# Altium PCB TYH-PD67W 2C1A 主控板.pcbdoc
Units mm, origin at the board's own origin, x right, y up, seen from the top; angles counter-clockwise.
Board outline 94.32 x 66.89 mm, 5 copper layers (Top Layer, Signal Layer 3, Signal Layer 1, Signal Layer 2, Bottom Layer), stack 0.941 mm thick; 54 components, 153 nets, 193 pads, 200 vias.
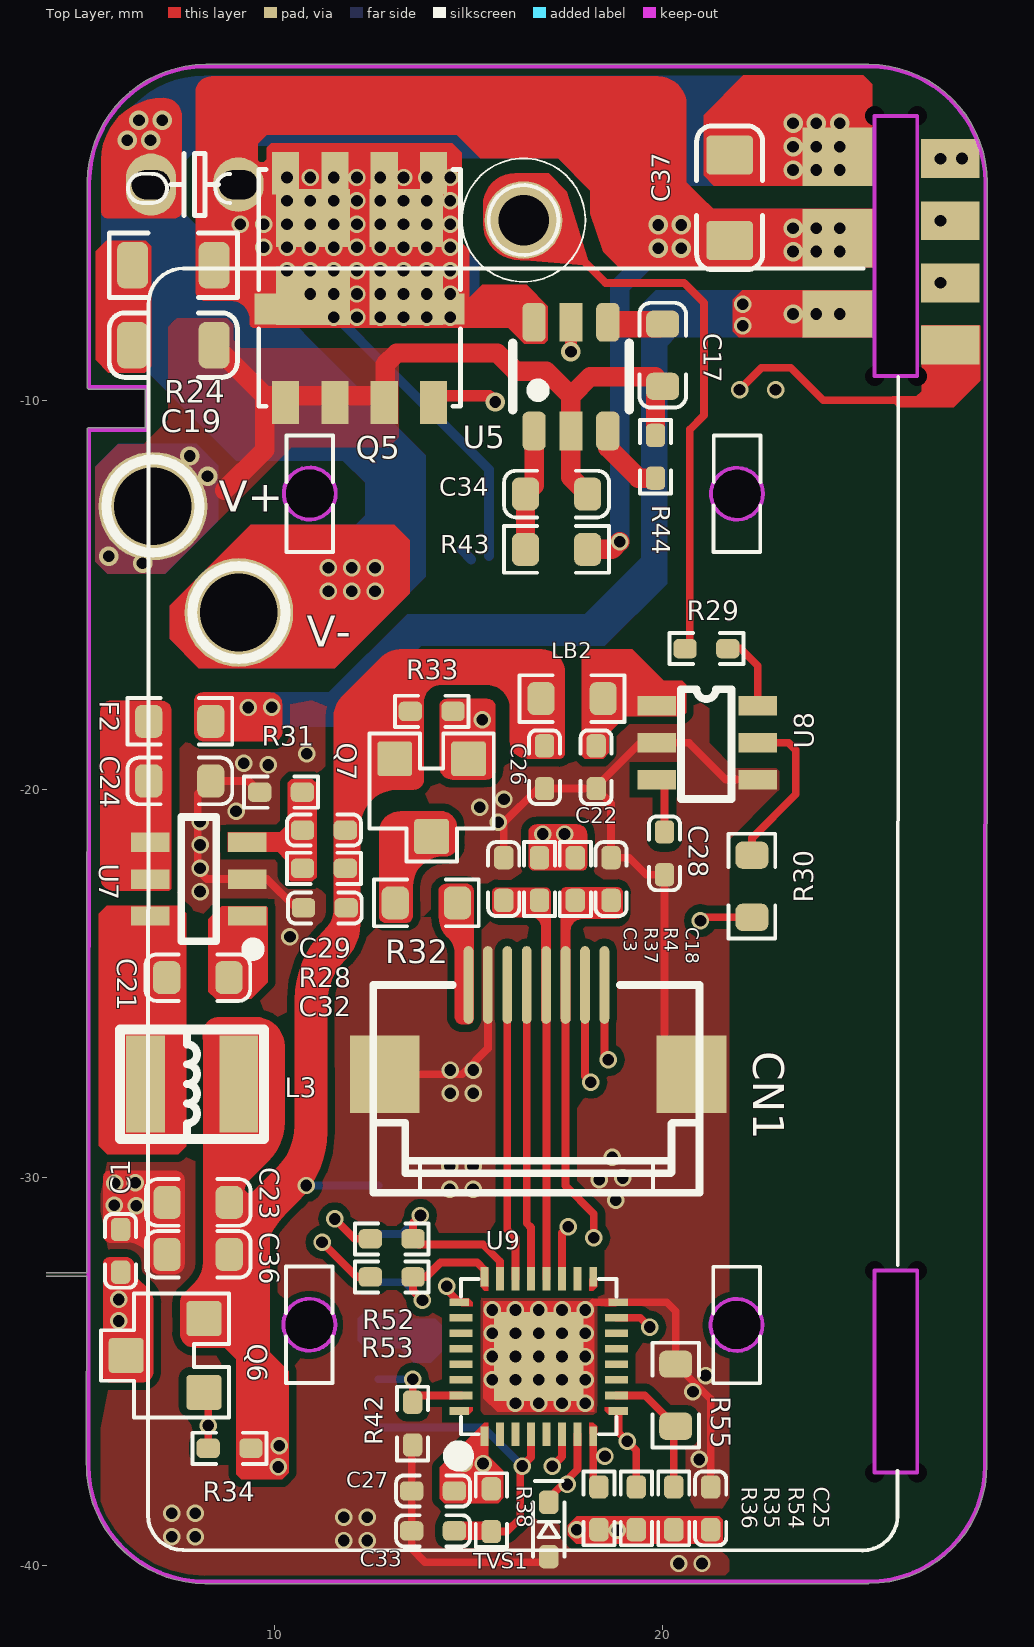
[diagram p0: Top Layer view]
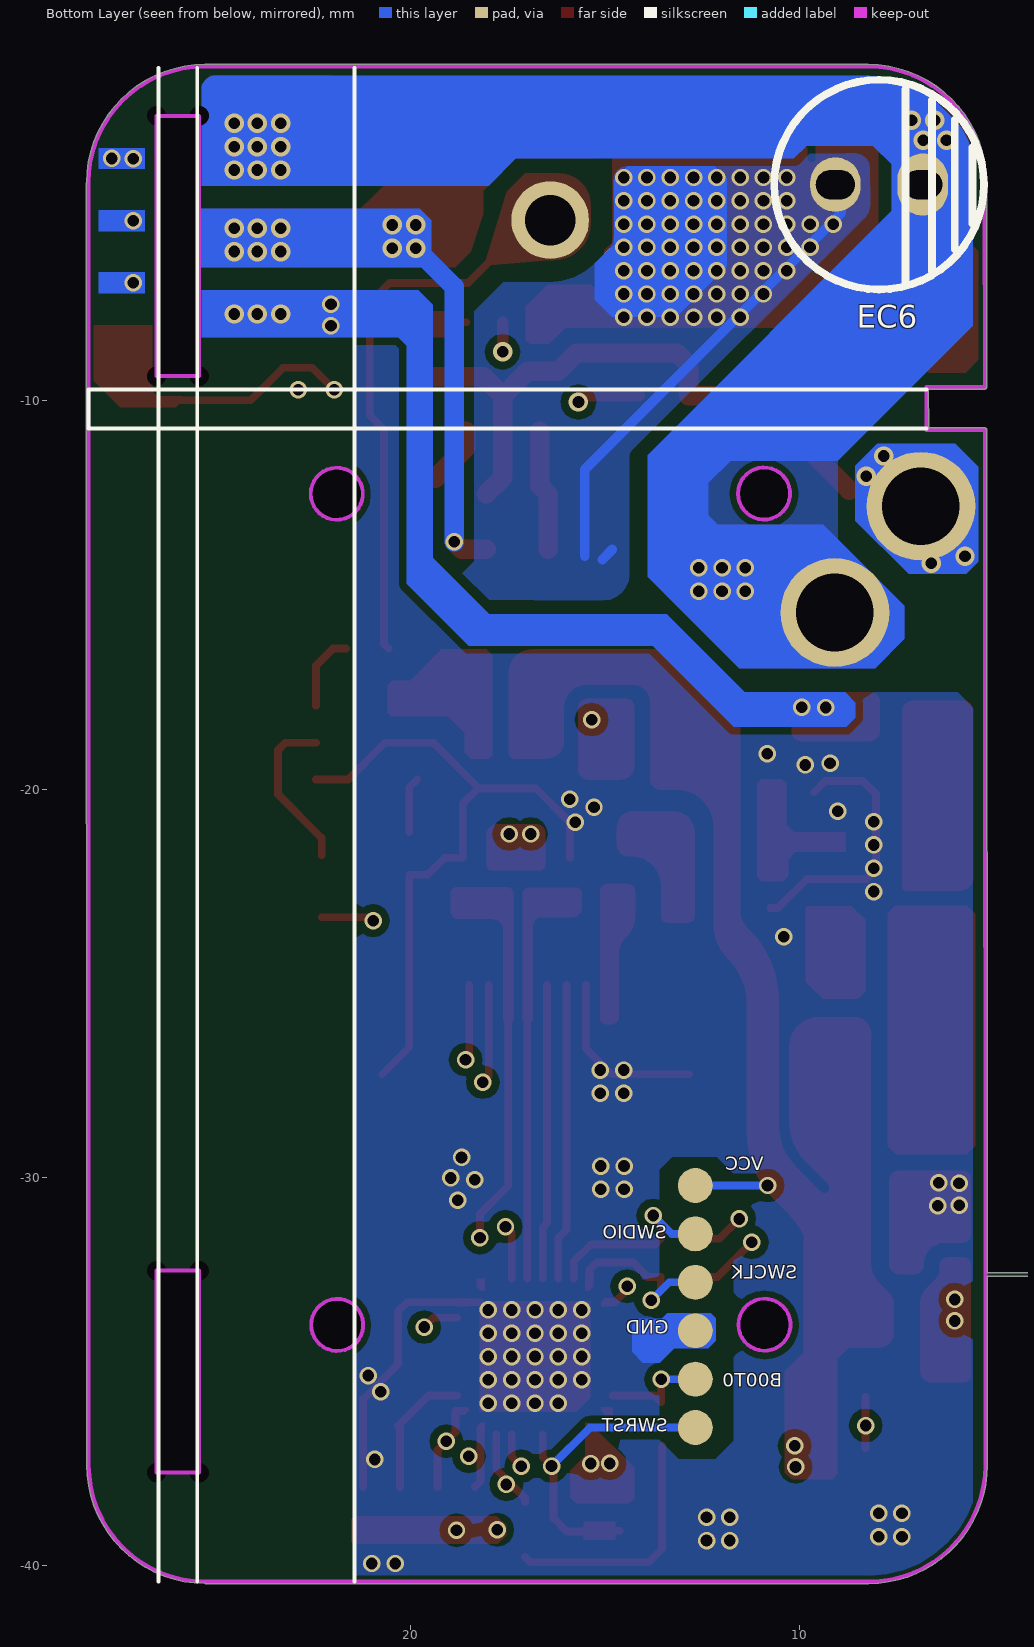
[diagram p1: Bottom Layer view, seen from below]
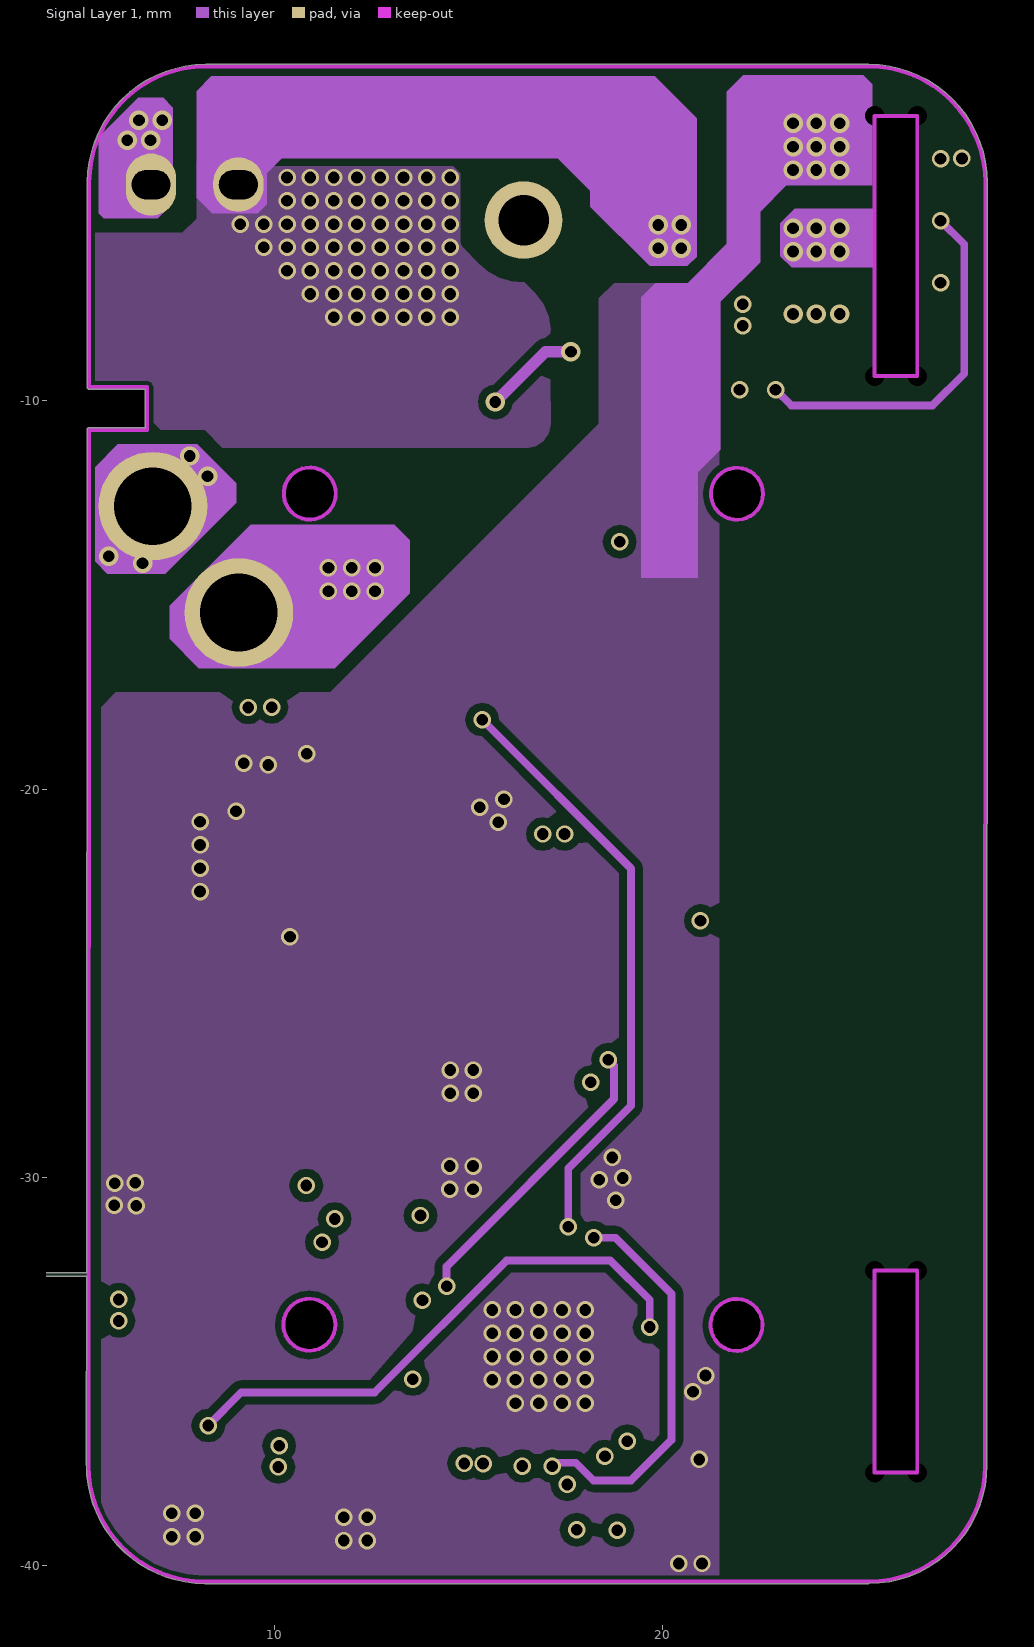
[diagram p2: Signal Layer 1]
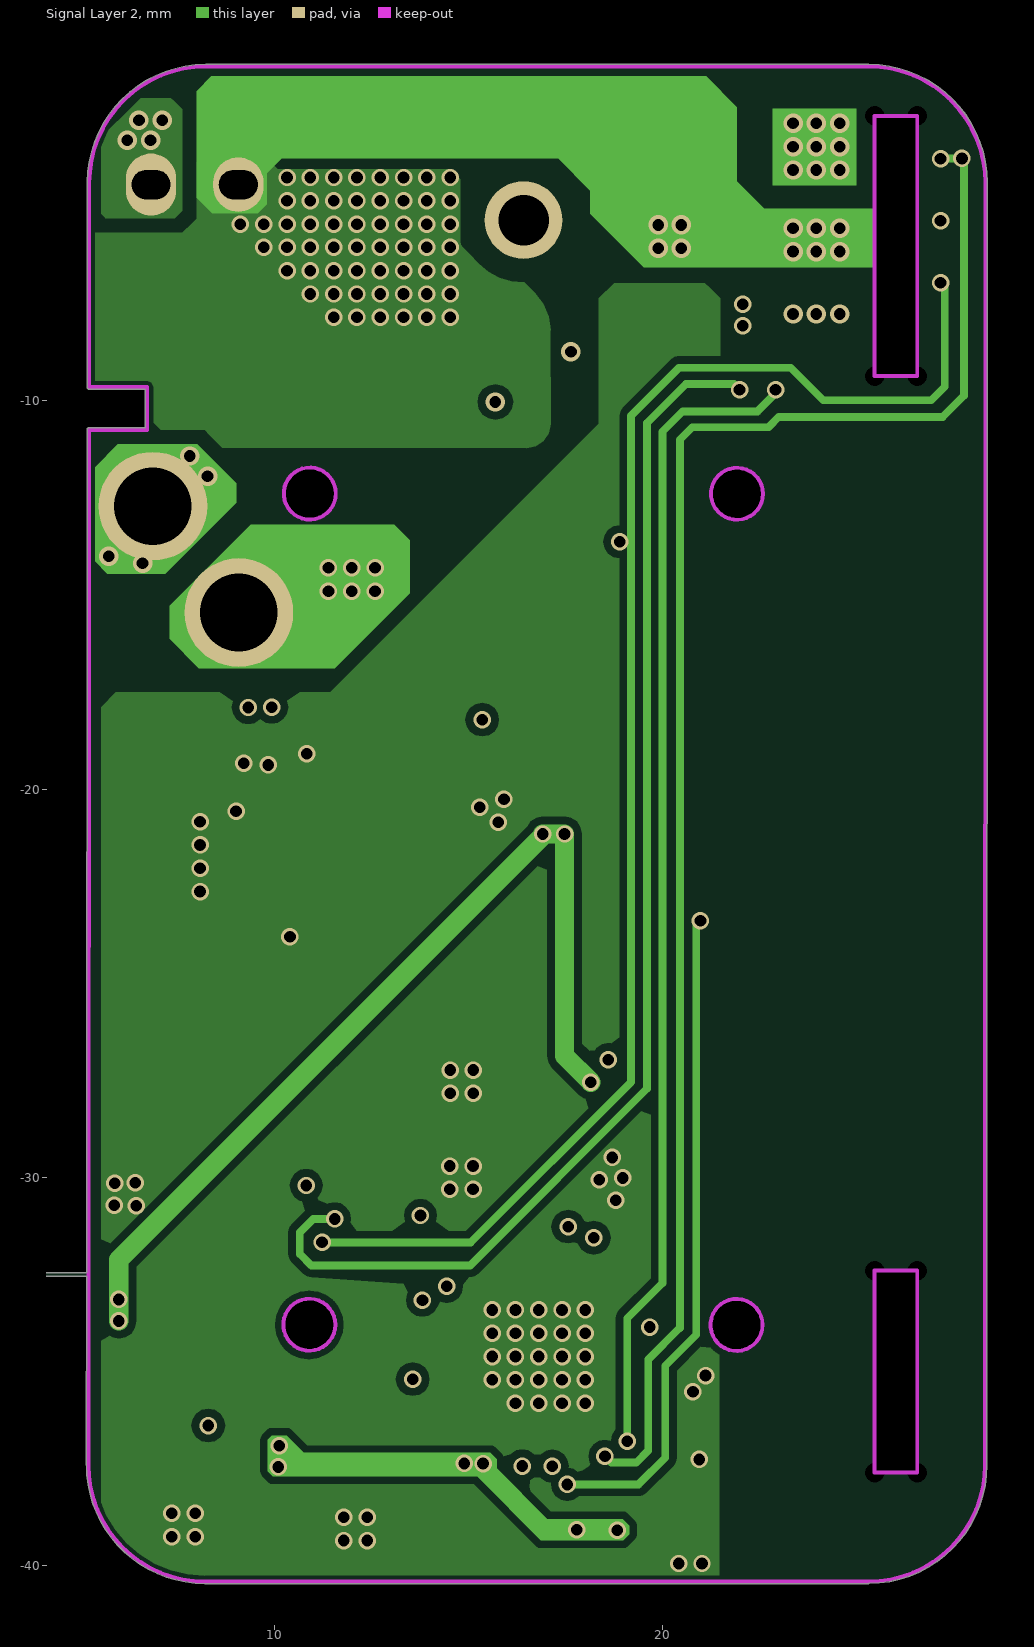
[diagram p3: Signal Layer 2]
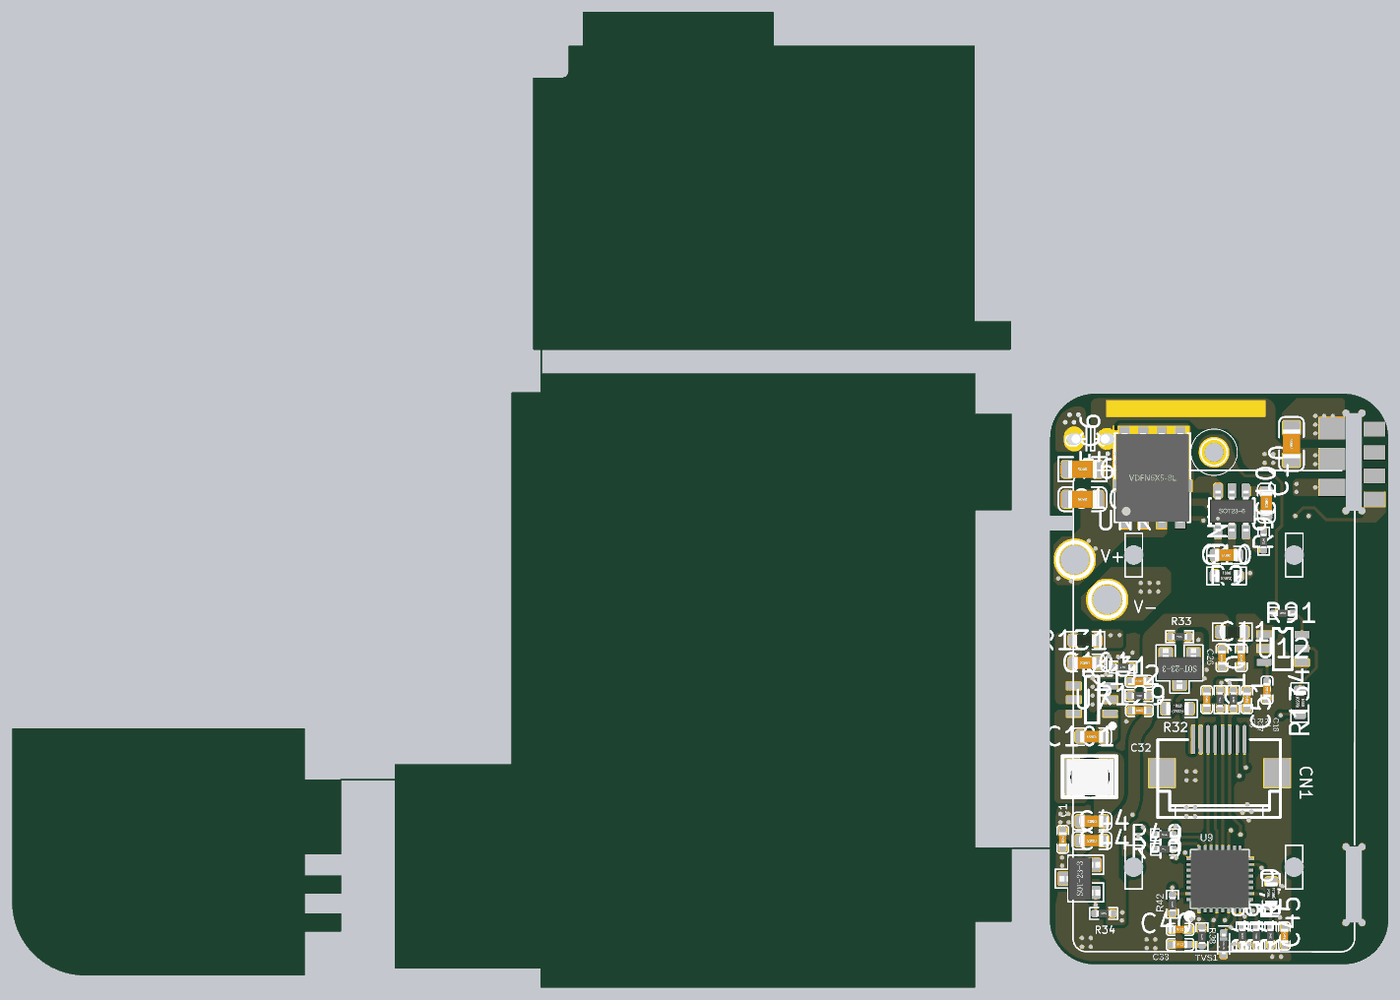
[diagram p4: 3D render of the assembled board from above, using the file's embedded part models]

## Layer stack, top to bottom
Top Solder: solder mask 0.0102, Solder Resist, Dk 3.5
Top Layer: signal copper 0.0356
Dielectric 1: core 0.254, FR-4, Dk 4.2
Signal Layer 3: signal copper 0.036
Dielectric 4: prepreg 0.127, Dk 4.2
Signal Layer 1: signal copper 0.036
Dielectric 2: core 0.254, Dk 4.2
Signal Layer 2: signal copper 0.036
Dielectric 3: prepreg 0.127, Dk 4.2
Bottom Layer: signal copper 0.0356
Bottom Solder: solder mask 0.0102, Solder Resist, Dk 3.5

## Board outline
-60.945,-41.225 -45.944,-41.225 ccw(c-45.944,-41.2) -45.919,-41.2 -45.919,-38.225 -43.445,-38.225 ccw(c-43.445,-38.2) -43.419,-38.2 -43.419,-37 ccw(c-43.445,-37) -43.445,-36.975 -45.919,-36.975 -45.919,-35.625 -43.445,-35.625 ccw(c-43.445,-35.6) -43.419,-35.6 -43.419,-34.4 ccw(c-43.445,-34.4) -43.445,-34.375 -45.919,-34.375 -45.919,-32.925 -43.445,-32.925 ccw(c-43.445,-32.9) -43.419,-32.9 -43.419,-27.85 -39.751,-27.85 -39.759,-40.693 ccw(c-39.709,-40.7) -39.709,-40.75 -29.759,-40.752 -29.76,-42.002 ccw(c-29.71,-42.002) -29.71,-42.052 0,-42.052 ccw(c0,-42.002) 0.05,-42.002 0.05,-37.55 2.5,-37.55 ccw(c2.5,-37.5) 2.55,-37.5 2.55,-32.55 5.163,-32.55 5.16,-37.409 ccw(c5.21,-37.409) 5.16,-37.409 ccw(c8.207,-37.409) 8.207,-40.456 ccw(c8.207,-40.406) 8.207,-40.456 ccw(c8.207,-40.406) 8.207,-40.456 25.296,-40.456 ccw(c25.296,-40.406) 25.308,-40.455 ccw(c25.296,-37.407) 28.344,-37.407 28.352,-4.393 ccw(c28.302,-4.393) 28.352,-4.393 ccw(c28.302,-4.393) 28.351,-4.381 ccw(c25.304,-4.393) 25.304,-1.346 8.229,-1.346 ccw(c8.229,-4.393) 5.181,-4.375 ccw(c5.228,-4.393) 5.178,-4.393 5.175,-9.653 ccw(c5.225,-9.653) 5.225,-9.703 6.674,-9.704 6.673,-10.703 5.225,-10.702 ccw(c5.225,-10.753) 5.174,-10.753 5.163,-32.45 0.05,-32.45 0.05,-9.32 2.5,-9.32 ccw(c2.5,-9.269) 2.55,-9.269 2.55,-2.769 ccw(c2.5,-2.769) 2.5,-2.719 0.05,-2.719 0.05,0 ccw(c0,0) 0,0.05 -29.65,0.05 -29.65,1.682 2.433,1.682 ccw(c2.433,1.733) 2.483,1.733 ccw(c2.433,1.733) 2.482,1.745 ccw(c2.45,1.784) 2.5,1.784 2.5,3.584 ccw(c2.45,3.584) 2.45,3.635 0,3.635 0,22.484 ccw(c-0.05,22.484) -0.014,22.52 ccw(c-0.05,22.484) -0.05,22.535 -13.768,22.535 -13.768,24.784 ccw(c-13.819,24.784) -13.819,24.835 -26.819,24.835 ccw(c-26.819,24.784) -26.869,24.784 -26.869,22.535 -27.789,22.535 ccw(c-27.789,22.484) -27.84,22.483 -27.84,20.784 cw(c-28.289,20.784) -28.289,20.335 cw(c-28.289,20.784) -28.289,20.335 cw(c-28.289,20.284) -28.289,20.335 -30.217,20.335 ccw(c-30.217,20.284) -30.268,20.284 -30.268,1.733 ccw(c-30.217,1.733) -30.217,1.682 -29.75,1.682 -29.75,-1.25 -31.7,-1.25 ccw(c-31.7,-1.3) -31.75,-1.3 -31.75,-26.75 -39.7,-26.75 ccw(c-39.7,-26.8) -39.75,-26.8 -39.751,-27.75 -43.445,-27.75 ccw(c-43.445,-27.8) -43.488,-27.775 -45.919,-27.775 -45.919,-24.3 ccw(c-45.945,-24.3) -45.945,-24.275 -65.945,-24.275 ccw(c-65.945,-24.3) -65.97,-24.3 -65.97,-36.2 ccw(c-60.945,-36.2)
cut-out: 26.55,-32.4 25.45,-32.4 25.45,-37.6 26.55,-37.6
cut-out: 25.45,-9.369 26.55,-9.369 26.55,-2.669 25.45,-2.669
cut-out: 11.579,-12.393 11.579,-12.392 ccw(c10.912,-12.392) 10.912,-11.725 10.902,-11.725 ccw(c10.902,-12.39) 10.237,-12.39 10.237,-12.418 ccw(c10.889,-12.418) 10.889,-13.07 10.902,-13.07 ccw(c10.902,-12.393)
cut-out: 11.567,-33.793 11.567,-33.792 ccw(c10.9,-33.792) 10.9,-33.125 10.89,-33.125 ccw(c10.89,-33.79) 10.226,-33.79 10.226,-33.818 ccw(c10.877,-33.818) 10.877,-34.47 10.89,-34.47 ccw(c10.89,-33.793)
cut-out: 22.567,-33.799 22.567,-33.798 ccw(c21.9,-33.798) 21.9,-33.131 21.89,-33.131 ccw(c21.89,-33.796) 21.226,-33.796 21.226,-33.824 ccw(c21.877,-33.824) 21.877,-34.476 21.89,-34.476 ccw(c21.89,-33.799)
cut-out: 22.579,-12.399 22.579,-12.398 ccw(c21.912,-12.398) 21.912,-11.731 21.902,-11.731 ccw(c21.902,-12.396) 21.237,-12.396 21.237,-12.424 ccw(c21.889,-12.424) 21.889,-13.076 21.902,-13.076 ccw(c21.902,-12.399)

## Design rules (kind name [scope] priority, off if disabled: settings)
Clearance Clearance_19 [InNet('NetC4_2') vs InNet('PGND')] p1: gap=0.4
Clearance Clearance_18 [InNet('NetR15_1') vs InNet('PGND')] p2: gap=1
Clearance Clearance_17 [InNet('NetN_1') vs InNet('NetBD1_1')] p3: gap=1.55
Clearance Clearance_16 [InNet('NetN_1') vs InNet('PGND')] p4: gap=1.5
Clearance Clearance_15 [InNet('VIN') vs InNet('PGND')] p5 off: gap=5.8
Clearance Clearance_14 [InNet('CS') vs InNet('Bais-L')] p6: gap=0.45
Clearance Clearance_13 [InNet('SW') vs InNet('CS')] p7: gap=1.5
Clearance Clearance_12 [InNet('NetR15_1') vs InNet('CS')] p8: gap=1
Clearance Clearance_11 [InNet('NetBD1_3') vs InNet('CS')] p9: gap=1.1
Clearance Clearance_10 [InNet('HV') vs InNet('CS')] p10: gap=1.1
Clearance Clearance_9 [InNet('NetL2_1') vs InNet('CS')] p11: gap=1.5
Clearance Clearance_8 [InNet('NetC1_2') vs InNet('PGND')] p12: gap=1.2
Clearance Clearance_7 [InNet('NetBD1_3') vs InNet('PGND')] p13: gap=1.2
Clearance Clearance_6 [InNet('NetC2_2') vs InNet('PGND')] p14: gap=1.3
Clearance Clearance_5 [InNet('Bais-L') vs InNet('PGND')] p15: gap=0.45
Clearance Clearance_4 [InNet('SW') vs InNet('PGND')] p16: gap=1.5
Clearance Clearance_3 [InNet('HV') vs InNet('PGND')] p17: gap=1.2
Clearance Clearance_2 [InNet('NetL2_1') vs InNet('PGND')] p18: gap=1.5
Clearance Clearance_1 [OnLayer('Keep-Out Layer')] p19: gap=0.1
Clearance [All] p20: gap=0.2
PlaneConnect [All] p1: planeconnectstyle=Direct reliefexpansion=0.508 reliefentries=4 reliefconductorwidth=0.3 reliefairgap=0.254
PolygonConnect [All] p1: connectstyle=Direct reliefconductorwidth=0.3 reliefentries=4 polygonreliefangle="90 Angle" airgapwidth=0.3
RoutingVias [All] p1: holewidth=0.711 width=1.27 viastyle="Through Hole" minholewidth=0.711 minwidth=1.27 maxholewidth=0.711 maxwidth=1.27
SolderMaskExpansion [All] p1: expansion=0.05
Width [All] p1: maxlimit=10 minlimit=0.1 preferedwidth=0.2
28 further rules are at their usual default settings.

## Components (designator, comment, footprint, x,y, rotation, side; value= is the part's Value field where it differs from the comment)
C1 "100nF 0402" 0402C 6.439,-30.942 r270 top
C3 "NC/0402" 0402C 16.302,-21.368 r270 top
C17 "2.2nF/250V/0805" 0603CX#1 19.995,-8.031 r270 top (schematic designator C10)
C18 "NC/0402" 0402C 19.066,-21.368 r270 top (schematic designator C2)
C19 "2.2nF/250V/0805" 0805CX 8.445,-8.572 r180 top (schematic designator C10)
C21 "104/50V X7R 0603" 0603CX#1 7.226,-24.856 r0 top (schematic designator C101)
C22 "106/10V" 0402C 17.882,-20.389 r90 top (schematic designator C101)
C23 "10uF/10V" 0603CX#1 8.836,-30.645 r180 top (schematic designator C44)
C24 "104/50V X7R 0603" 0603CX#1 8.361,-19.794 r180 top (schematic designator C101)
C25 "1uF/25V" 0402C 21.631,-37.57 r270 top (schematic designator C45)
C26 "10nF" 0402C 16.553,-20.389 r90 top (schematic designator C4)
C27 "0.1uF/25V" 0402C 13.132,-37.674 r0 top (schematic designator C40)
C28 "104/25V/NC" 0402C 19.642,-22.606 r90 top (schematic designator C51)
C29 "NC" 0402C 10.323,-20.658 r0 top (schematic designator C112)
C32 "1uF" 0402C 10.347,-22.661 r0 top (schematic designator C5)
C33 "100nF" 0402C 13.132,-38.7 r0 top (schematic designator C6)
C34 "2.2nF/250V/0805" 0603CX#2 17.262,-12.406 r180 top (schematic designator C10)
C36 "10uF/10V" 0603CX#1 8.836,-31.982 r180 top (schematic designator C44)
C37 "2.2nF/250V/0805" 0805C 20.869,-6.628 r90 top (schematic designator C10)
CN1 "8.07A0.006200" "70W 屏座" 16.693,-25.17 r270 top locked
EC6 "560uF/25V/6.3*16" EG-5*17L 7.946,-4.438 r90 bottom
F2 "10KF 0402" 0603LX 6.761,-18.259 r0 top (schematic designator R131)
L3 "3.3uH NR3010" NR3010 7.885,-27.593 r0 top (schematic designator L4)
LB2 "104/25V" 0603LX 18.462,-17.671 r180 top (schematic designator C11)
Q5 "Comment" DFN5*6 10.286,-10.048 r0 top
Q6 "2N7002KL SOT-23" SOT-23_R 7.183,-34.585 r90 top (schematic designator Q8)
Q7 "2N7002KL SOT-23" SOT-23_R 14.047,-20.221 r180 top (schematic designator Q8)
R4 "4.7K" 0402R 17.745,-21.768 r270 top
R24 "10R/1206" 0805RX 8.445,-6.513 r180 top (schematic designator R6)
R28 "31.6KF 0402" 0402R 10.723,-22.042 r0 top (schematic designator R129)
R29 "10K" 0402R 21.672,-16.386 r180 top (schematic designator R91)
R30 "100R" 0603RX#1 22.293,-22.503 r270 top (schematic designator R134)
R31 "10KF 0402" 0402R 9.618,-20.082 r0 top (schematic designator R131)
R32 "10R" 0603RX#2 13.11,-22.934 r0 top (schematic designator R2)
R33 "10K" 0402R 13.498,-18 r0 top (schematic designator R1)
R34 "10K" 0402R 9.393,-36.975 r180 top (schematic designator R3)
R35 "4K7 NC" 0402R 19.316,-37.97 r270 top (schematic designator R49)
R36 "4K7 NC" 0402R 18.353,-37.97 r270 top (schematic designator R49)
R37 "4.7K" 0402R 16.823,-21.768 r270 top (schematic designator R5)
R38 "10K" 0402R 15.583,-39.117 r90 top (schematic designator R6)
R42 "10K" 0402R 13.558,-36.889 r90 top (schematic designator R7)
R43 "51R/0402" 0603RX#1 17.263,-13.831 r0 top (schematic designator R9)
R44 "51R/0402" 0402R 19.81,-10.896 r270 top (schematic designator R9)
R52 "4K7 NC" 0402R 12.468,-31.582 r0 top (schematic designator R49)
R53 "4K7 NC" 0402R 12.468,-32.563 r0 top (schematic designator R49)
R54 "4K7 NC" 0402R 20.28,-37.97 r270 top (schematic designator R49)
R55 "4K7 NC" 0603rx 20.33,-35.608 r90 top (schematic designator R49)
TVS1 "Comment" SOD-723 17.062,-39.065 r90 top
U5 "Comment" SOT-23-6S 16.683,-10.783 r90 top
U7 "RY9420BT6" SOT-23-6#1 8.051,-22.32 r180 top
U8 "RM1233A" SOT-23-6#2 21.143,-18.808 r0 top (schematic designator U12)
U9 "Comment" "QFN4*4-32L TYH" 16.805,-34.612 r0 top
V+ "Comment" PAD-AC 6.869,-12.718 r0 top
V- "Comment" PAD-AC 9.083,-15.458 r0 top

## Footprints (in the part's own frame and the unit in brackets; to place one, negate y for a bottom-side part, rotate by r counter-clockwise, add the part's x,y. Pads: shape width x height; smd on the part's side, far side on the other; paste and mask are expansions set on the pad)
"70W 屏座" [mm]
  oval 2x0.25 smd: 1(-0.124,-1.698) 2(-0.124,-1.198) 3(-0.124,-0.698) 4(-0.124,-0.198) 5(-0.124,0.302) 6(-0.124,0.802) 7(-0.124,1.302) 8(-0.124,1.802)
  rect 2x1.8 smd: 2(2.176,-3.855) 2(2.176,4.045)
  silkscreen extent -0.12,-4.15 5.23,4.25
0402C [mm]
  rrect50% 0.6x0.5 smd: 1(0.4,-0.4) 2(1.5,-0.4)
  silkscreen extent 0,-0.8 1.9,0, body extent 0.45,-0.66 1.45,-0.14, height 0.53
0402R [mm]
  rrect50% 0.6x0.5 smd: 1(0,0) 2(1.1,0)
  silkscreen extent -0.4,-0.4 1.5,0.4, body extent 0.05,-0.25 1.05,0.25, height 0.3
0603CX#1 [mm]
  rrect50% 0.7x0.85 smd: 1(0,0) 2(1.6,0)
  silkscreen extent -0.55,-0.6 2.15,0.6, body extent 0,-0.41 1.6,0.41, height 0.81
0603CX#2 [mm]
  rrect50% 0.7x0.85 smd: 1(-0.8,0) 2(0.8,0)
  silkscreen extent -1.35,-0.6 1.35,0.6, body extent -0.8,-0.41 0.8,0.41, height 0.81
0603LX [mm]
  rrect50% 0.7x0.85 smd: 1(0,0) 2(1.6,0)
  silkscreen extent -0.55,-0.6 2.15,0.6, body extent -0.02,-0.4 1.58,0.4, height 0.4
0603RX#1 [mm]
  rrect50% 0.7x0.85 smd: 1(-0.8,0) 2(0.8,0)
  silkscreen extent -1.35,-0.6 1.35,0.6, body extent -0.77,-0.42 0.78,0.43, height 0.45
0603RX#2 [mm]
  rrect50% 0.7x0.85 smd: 1(0,0) 2(1.6,0)
  silkscreen extent -0.55,-0.6 2.15,0.6, body extent 0.03,-0.42 1.58,0.43, height 0.45
0603rx [mm]
  rrect50% 0.7x0.85 smd: 1(-0.8,0) 2(0.8,0)
  silkscreen extent -1.35,-0.6 1.35,0.6, body extent -0.77,-0.42 0.78,0.43, height 0.45
0805C [mm]
  rrect20% 1x1.2 smd: 1(0.75,-0.85) 2(2.95,-0.85)
  silkscreen extent 0,-1.7 3.7,0, body extent 0.85,-1.46 2.85,-0.24, height 0.51
0805CX [mm]
  rrect50% 0.8x1.2 smd: 1(0,0) 2(2.1,0)
  silkscreen extent -0.6,-0.83 2.7,0.83, body extent 0.05,-0.61 2.05,0.61, height 0.51
0805RX [mm]
  rrect50% 0.8x1.2 smd: 1(0,0) 2(2.1,0)
  silkscreen extent -0.6,-0.83 2.7,0.83, body extent 0.05,-0.61 2.05,0.61, height 0.51
DFN5*6 [mm]
  rect 0.7x1.1 smd: 1(0,0) 2(1.27,0) 3(2.54,0) 4(3.81,0) 5(3.81,5.9) 6(2.54,5.9) 7(1.27,5.9) 8(0,5.9)
  rect 1x0.8 smd: 8(-0.295,2.402) 8(4.105,2.402)
  rect 1.9x1.5 smd: 8(0.705,2.75) 8(0.705,4.75) 8(3.105,2.75) 8(3.105,4.75)
  silkscreen extent -0.69,-0.1 4.51,6, body extent -0.59,-0.1 4.41,6, height 1.06
EG-5*17L [mm]
  oval 1.4x1.3 hole 0.75 slot 1 at 90 deg: 1(0,1.125)
  oval 1.6x1.3 hole 0.75 slot 1 at 90 deg: 2(0,-1.125)
  silkscreen extent -2.7,-2.7 2.7,2.7, body extent -2.7,-2.7 2.7,2.7, height 17
NR3010 [mm]
  rect 1x2.5 smd: 1(-1.206,-0.001) 2(1.194,-0.001)
  silkscreen extent -1.87,-1.42 1.84,1.4, body extent -1.58,-1.38 1.63,1.34, height 2
PAD-AC [mm]
  round 2.8 hole 2: 1(0,0)
  silkscreen extent -1.2,-1.2 1.2,1.2
"QFN4*4-32L TYH" [mm]
  rect 0.2x0.5 smd: 1(-1.4,-2.05) 8(1.4,-2.05) 17(1.4,2.05) 24(-1.4,2.05)
  rect 0.2x0.6 smd: 2(-1,-2) 3(-0.6,-2) 4(-0.2,-2) 5(0.2,-2) 6(0.6,-2) 7(1,-2) 18(1,2) 19(0.6,2) 20(0.2,2) 21(-0.2,2) 22(-0.6,2) 23(-1,2)
  rect 0.5x0.2 smd: 9(2.05,-1.4) 16(2.05,1.4) 25(-2.05,1.4) 32(-2.05,-1.4)
  rect 0.6x0.2 smd: 10(2,-1) 11(2,-0.6) 12(2,-0.2) 13(2,0.2) 14(2,0.6) 15(2,1) 26(-2,1) 27(-2,0.6) 28(-2,0.2) 29(-2,-0.2) 30(-2,-0.6) 31(-2,-1)
  rect 2.3x2.3 smd: 33(0,0)
  Top Layer region: -1.425,1.425 1.425,1.425 1.425,-1.425 -1.075,-1.425 -1.425,-1.075
  Top Layer region: -2,-1.5 -1.8,-1.5 -1.7,-1.4 -1.7,-1.3 -2,-1.3
  Top Layer region: -2,1.5 -1.8,1.5 -1.7,1.4 -1.7,1.3 -2,1.3
  Top Layer region: 1.5,-2 1.5,-1.8 1.4,-1.7 1.3,-1.7 1.3,-2
  Top Layer region: -1.5,-2 -1.5,-1.8 -1.4,-1.7 -1.3,-1.7 -1.3,-2
  Top Layer region: 2,-1.5 1.8,-1.5 1.7,-1.4 1.7,-1.3 2,-1.3
  Top Layer region: 2,1.5 1.8,1.5 1.7,1.4 1.7,1.3 2,1.3
  Top Layer region: 1.5,2 1.5,1.8 1.4,1.7 1.3,1.7 1.3,2
  Top Layer region: -1.5,2 -1.5,1.8 -1.4,1.7 -1.3,1.7 -1.3,2
  silkscreen extent -2.27,-2.76 2,2, body extent -2,-2 2,2, height 0.75
SOD-723 [mm]
  rrect50% 0.6x0.5 smd: 1(-0.7,0) 2(0.7,0)
  silkscreen extent -0.7,-0.41 1.25,0.41, body extent -0.7,-0.3 0.7,0.3, height 0.53
SOT-23-6#1 [mm]
  rect 1x0.5 smd: 1(-1.25,0.95) 2(-1.25,0) 3(-1.25,-0.95) 4(1.25,-0.95) 5(1.25,0) 6(1.25,0.95)
  silkscreen extent -1.5,-1.6 0.45,1.9, body extent -1.4,-1.5 1.4,1.5, height 1.15
SOT-23-6#2 [mm]
  rect 1x0.5 smd: 1(-1.3,0.95) 2(-1.3,0) 3(-1.3,-0.95) 4(1.3,-0.95) 5(1.3,0) 6(1.3,0.95)
  silkscreen extent -0.67,-1.45 0.63,1.37
SOT-23-6S [mm]
  rrect50% 1x0.6 smd: 1(0,0) 3(0,-1.9) 4(2.8,-1.9) 6(2.8,0)
  rect 1x0.6 smd: 2(0,-0.95) 5(2.8,-0.95)
  silkscreen extent 0.55,-2.45 2.25,0.55, body extent -0.01,-2.45 2.8,0.55, height 1.15
SOT-23_R [mm]
  rrect20% 0.9x0.9 smd: 1(-0.95,-1) 2(0.95,-1) 3(0,1)
  silkscreen extent -1.6,-1.65 1.6,1.65, body extent -1.46,-1.44 1.44,1.36, height 1.2

## Part data
C1 C3 C18 C26 C32 C33: library part CAP_0603
C17 C19 C34 C37: library part CAP
C23 C25 C27 C36: library part CAP, "X7R, 25V, +/-5%"
C29: library part "CAP SEMI"
EC6: library part CAPACITOR, "C?"
L3: library part Inductor, "102125 铁?"
LB2: library part CAPZ
Q6 Q7: library part NMOS
R4 R32 R33 R34 R37 R38 R42: library part Res_0603
R24 R43 R44: library part Res1, "Resistor"
R35 R36 R52 R53 R54 R55: library part RES2Z
U7: library part ME3121, "DC-DC BUCK"
U8: "U?"

## Free pads (board coordinates)
  round 0.9 smd far side: 0(12.678,-36.441) 0(12.678,-35.195) 0(12.678,-33.948) 0(12.678,-32.702) 0(12.678,-31.455) 0(12.678,-30.209)
  round 2 hole 1.3: 0(16.412,-5.352)
  rect 1.8x1.2 smd: 3(24.5,-7.769)
  rect 1.8x1.5 smd: 3(24.5,-5.819) 3(24.5,-3.719)
  rect 1.5x1 smd: 3(27.4,-8.569) 3(27.4,-6.969) 3(27.4,-5.369) 3(27.4,-3.769)
  round 0.2 hole 0.5: 8(26.55,-9.369) 9(25.45,-9.369) 10(25.45,-2.669) 11(26.55,-2.669) 12(25.45,-32.4) 13(26.55,-32.4) 14(25.45,-37.6) 15(26.55,-37.6)

## Via types
v1: diameter 0.45, hole 0.3, Top Layer to Bottom Layer, tented both sides, 168 vias
v2: diameter 0.5, hole 0.3, Top Layer to Bottom Layer, tented both sides, 32 vias

## Nets (pads, with @x,y where several pads share a name; then routed paths per layer and width w, separated by ;. In a path a pad name is that pad's centre, name@x,y a point inside that pad or via, vN(x,y) a via of type N, cw(c..) or ccw(c..) an arc to the next point about the centre after c; other vN are vias at no path point)
3.3V: C22.2 LB2.1 U8.1 | length 2.8
  Top Layer w0.2: C22.2 18.282,-17.851 LB2.1 18.65,-17.858 U8.1
A: 
A+: 
A-: 
Bais-L: 
BOOT0: pad.0@12.678,-35.195 R42.2 U9.31 | length 2.8
  Top Layer w0.2: v1(13.558,-35.195) R42.2 13.734,-35.612 U9.31
  Bottom Layer w0.2: pad.0@12.678,-35.195 v1(13.558,-35.195)
CC1: 
CC2: 
CPA: 
CS: CN1.8 U9.25 | length 10.3
  Top Layer w0.2: v1(14.432,-32.803) 14.432,-32.89 U9.25 ; CN1.8 18.495,-26.871 v1(18.592,-26.969)
  Signal Layer 1 w0.2: v1@14.534,-32.803 v1(14.432,-32.803) 14.432,-32.293 18.743,-27.983 18.743,-27.119 v1(18.592,-26.969)
D: 
D+: 
D-: 
DM: 
DP: 
EM: 
EN: 
EN_IC: 
FB: 
G-SR: Q5.4 U5.5 | length 4.9
  Top Layer w0.3: Q5.4@14.119,-9.878 15.529,-9.878 v2(15.686,-10.035) ; v2(17.633,-8.744) U5.5
  Signal Layer 1 w0.3: v2(15.686,-10.035) 16.977,-8.744 v2(17.633,-8.744)
GND-C: 
HV: 
ISET: 
KEY: R30.2 TVS1.2 U9.7 | length 20.4
  Top Layer w0.2: TVS1.2 17.062,-38.258 17.805,-37.516 U9.7 ; v1(20.969,-23.388) 21.053,-23.303 R30.2
  Signal Layer 2 w0.2: v1(17.542,-37.905) 19.374,-37.905 20.06,-37.219 20.06,-34.848 20.859,-34.048 20.859,-23.497 v1(20.969,-23.388)
KEY1: R29.1 U8.6 | length 2
  Top Layer w0.2: R29.1 22.004,-16.386 22.443,-16.825 U8.6
LEDA: CN1.1 R32.2
M: 
N: 
NetBD1_1: 
NetBD1_3: 
NetBD2_1: 
NetC1_2: 
NetC2_2: 
NetC3_2: 
NetC4_1: 
NetC4_2: 
NetC6_1: 
NetC10_2: C19.2 R24.2 | length 2.1
  Top Layer w0.254: C19.2@6.306,-8.553 R24.2@6.306,-6.494
NetC21_1: 
NetC22_1: 
NetC24_1: C24.2 F2.1 U7.4 U7.5
NetC25_2: 
NetC26_2: 
NetC30_2: 
NetC31_2: 
NetC100_2: 
NetC101_1: C21.1 L3.1 U7.6
NetC101_2: C21.2 U7.1
NetC112_1: C29.1 R28.1 R31.2 U7.3
NetD4_K: 
NetF1_1: 
NetF1_2: 
NetKEY1_1: pad.0@16.412,-5.352 R29.2 | length 14.6
  Top Layer w0.2: pad.0@16.412,-5.352 16.906,-5.352 18.523,-6.97 20.545,-6.97 21.058,-7.484 21.058,-10.379 20.691,-10.746 20.691,-16.267 R29.2
NetL2_1: 
NetLF1_2: 
NetN_1: 
NetNTC2_1: 
NetQ1_3: Q7.3 R32.1
NetQ3_4: 
NetR15_1: 
NetR25_2: 
NetR29_1: 
NetR31_2: 
NetR32_2: 
NetR41_2: 
NetR42_2: 
NetR134_1: R30.1 U8.5 | length 4.2
  Top Layer w0.2: R30.1 22.293,-21.265 23.422,-20.137 23.422,-18.994 23.236,-18.808 U8.5
NetRX1_2: 
NetRX3_2: 
NetU1_26: U9.26
NetU1_27: U9.27
NetU1_28: U9.28
NetU1_29: U9.29
NetU1_30: U9.30
NetU1_32: U9.32
NewNet1: 
NewNet2: 
NewNet3: 
NewNet4: 
NewNet5: 
NewNet6: 
NewNet7: 
NewNet8: 
NewNet9: 
NewNet10: 
NewNet11: 
NewNet12: 
NewNet13: 
NewNet14: 
NewNet15: 
NewNet16: 
NewNet18: 
NewNet22: 
NewNet23: 
NewNet24: 
NewNet25: 
NewNet28: 
NewNet32: 
NewNet33: 
NewNet34: 
NewNet36: 
NewNet38: 
NewNet40: 
NewNet41: 
NewNet42: 
OPTO: 
OTP: 
PA2: U9.17
PA4: R54.1 R55.1 U9.10 | length 3.4
  Top Layer w0.2: U9.10 19.535,-35.612 R55.1 20.28,-36.458 R54.1
PA5: U9.11
PA6: U9.12
PA7: U9.13
PA8: U9.18
PA9: Q7.1 R33.2 U9.19 | length 16.7
  Top Layer w0.2: U9.19 17.405,-31.428 v1(17.564,-31.268)
  Signal Layer 1 w0.2: v1(15.347,-18.214) 19.179,-22.046 19.179,-28.155 17.564,-29.77 v1(17.564,-31.268)
PB0: U9.14
PB1: Q6.1 R34.2 U9.15 | length 16.5
  Top Layer w0.2: R34.2 Q6.1@8.293,-35.646 ; U9.15 19.419,-33.612 v1(19.66,-33.854)
  Signal Layer 1 w0.2: v1(8.293,-36.388) 9.146,-35.535 12.582,-35.535 15.976,-32.141 18.647,-32.141 19.66,-33.155 v1(19.66,-33.854)
PF0: U9.2
PF1: U9.3
PF3: U9.5
PGND: 
RS: CN1.4 U9.21 | length 7.6
  Top Layer w0.2: CN1.4 16.495,-31.179 16.605,-31.289 U9.21
RST: CN1.3 U9.22 | length 8
  Top Layer w0.2: CN1.3 15.995,-31.349 ; U9.22 16.205,-31.559 ; 15.995,-31.349 16.205,-31.559 ; 15.995,-31.349 16.205,-31.559
SCL: pad.3@27.4,-3.769 R36.1 U9.8 | length 43.8
  Top Layer w0.2: U9.8 18.205,-37.182 ; R36.1 18.205,-37.822 18.205,-37.182 ; v1(18.509,-37.182) 18.205,-37.182
  Signal Layer 2 w0.2: v1(18.509,-37.182) 18.67,-37.343 19.313,-37.343 19.623,-37.033 19.623,-34.69 20.439,-33.874 20.439,-11.006 20.76,-10.684 22.721,-10.684 22.986,-10.42 27.204,-10.42 27.751,-9.873 27.751,-3.816 v1(27.701,-3.765) ; v1(27.15,-3.769) v1@27.701,-3.769
SCL1: C18.2 CN1.6 R4.2 U9.6 | length 17.8
  Top Layer w0.2: v1(17.156,-37.438) 17.405,-37.189 U9.6 ; CN1.6 17.495,-30.215 18.221,-30.941 v1(18.221,-31.556)
  Signal Layer 1 w0.2: v1@17.168,-37.426 17.246,-37.348 17.757,-37.348 18.211,-37.802 19.18,-37.802 20.223,-36.759 20.223,-33 18.779,-31.556 v1(18.221,-31.556)
SDA: pad.3@27.4,-5.369 R35.1 U9.9 | length 41.5
  Top Layer w0.2: U9.9 18.855,-36.561 19.316,-37.023 R35.1
  Signal Layer 1 w0.2: v1(22.901,-9.717) 23.308,-10.123 26.941,-10.123 27.758,-9.306 27.758,-5.978 v1(27.15,-5.369)
  Signal Layer 2 w0.2: v1(19.085,-36.792) 19.085,-33.626 19.988,-32.724 19.988,-10.801 20.511,-10.278 22.435,-10.278 22.901,-9.811 v1(22.901,-9.717)
SDA1: C3.2 CN1.5 R37.2 U9.20 | length 7.6
  Top Layer w0.2: CN1.5 17.005,-25.055 U9.20
SET: R44.2 U5.3 | length 2
  Top Layer w0.5: U5.3 18.583,-11.209 19.37,-11.996 R44.2
SGND: C1.1 C3.1 C18.1 C22.1 C23.2 C24.1 C25.1 C26.1 C27.1 C28.1 C32.1 C33.1 C36.2 C37.2 CN1.2 EC6.2 pad.0@12.678,-33.948 pad.3@24.5,-3.719 R31.1 R42.1 R55.2 TVS1.1 U7.2 U8.2 U8.4 U9.16 U9.33 V-.1 | length 56.8
  Top Layer w0.2: R31.1 9.33,-19.793 C24.1 8.025,-20.13 8.025,-22.081 8.264,-22.32 U7.2 9.807,-22.32 10.547,-23.061 C32.1 ; CN1.2@12.838,-27.346 14.831,-27.346 15.495,-26.682 CN1.2@15.495,-25.046 ; R42.1@13.532,-36.914 C33.1 13.532,-39.564 13.876,-39.908 16.92,-39.908 TVS1.1 ; C3.1 15.902,-20.863 16.776,-19.989 C26.1 C22.1@18.237,-19.989 ; v1(16.805,-34.612) 18.205,-33.212 U9.16 20.095,-33.212 20.331,-33.448 R55.2 21.231,-35.708 C25.1 ; CN1.2@20.738,-27.346 20.042,-26.649 C28.1 19.571,-22.206 19.133,-21.768 C18.1 18.666,-20.374 C22.1 C22.1@18.237,-19.989 ; U8.4 21.62,-19.758 20.67,-18.808 U8.2 19.418,-18.808 C22.1@18.237,-19.989
  Bottom Layer w0.2: 11.742,-10.813 13.025,-12.096 13.025,-14.004
  Bottom Layer w0.254: EC6.2@6.68,-4.446 6.68,-5.751 11.742,-10.813
  other v1: 20.407,-39.941 21.007,-39.941 11.788,-39.351 12.388,-39.351 7.357,-39.252 7.957,-39.252 11.788,-38.751 12.388,-38.751 7.357,-38.652 7.957,-38.652 20.933,-37.262 16.205,-35.812 16.805,-35.812 17.405,-35.812 18.005,-35.812 20.775,-35.521 15.605,-35.212 16.205,-35.212 16.805,-35.212 17.405,-35.212 18.005,-35.212 21.099,-35.102 15.605,-34.612 16.205,-34.612 17.405,-34.612 18.005,-34.612 15.605,-34.012 16.205,-34.012 16.805,-34.012 17.405,-34.012 18.005,-34.012 15.605,-33.412 16.205,-33.412 16.805,-33.412 17.405,-33.412 18.005,-33.412 5.878,-30.721 6.438,-30.73 18.79,-30.585 14.512,-30.307 15.112,-30.307 5.887,-30.147 6.412,-30.138 18.36,-30.065 18.969,-30.015 14.512,-29.707 15.112,-29.707 18.697,-29.487 14.521,-27.836 15.121,-27.836 14.521,-27.236 15.121,-27.236 10.399,-23.806 8.083,-22.64 8.083,-22.04 8.083,-21.44 15.765,-20.853 8.083,-20.84 9.01,-20.577 15.286,-20.47 15.909,-20.265 9.842,-19.381 9.209,-19.335 10.826,-19.092 11.389,-14.907 11.989,-14.907 12.589,-14.907 11.389,-14.307 11.989,-14.307 12.589,-14.307
  other v2: 23.352,-4.062 23.952,-4.062 24.552,-4.062 23.352,-3.462 23.952,-3.462 24.552,-3.462 6.209,-3.295 6.809,-3.295 23.352,-2.862 23.952,-2.862 24.552,-2.862 6.51,-2.778 7.11,-2.778
SRCG_A: 
SW: 
SW-SR: 
SWCLK: pad.0@12.678,-32.702 R53.2 U9.24 | length 4.3
  Top Layer w0.2: v1(13.809,-33.161) 13.568,-32.92 R53.2 13.901,-32.563 14.274,-32.19 15.217,-32.19 15.405,-32.378 U9.24
  Bottom Layer w0.2: pad.0@12.678,-32.702 13.35,-32.702 v1(13.809,-33.161)
SWCLK1: pad.3@27.4,-6.969 R53.1 | length 40.2
  Top Layer w0.2: v1(11.225,-31.674) 12.114,-32.563 R53.1
  Signal Layer 2 w0.2: v1(11.225,-31.674) 15.051,-31.674 19.179,-27.546 19.179,-10.389 20.415,-9.152 23.291,-9.152 24.126,-9.988 26.91,-9.988 27.255,-9.643 27.255,-7.075 v1(27.15,-6.969)
SWCLK2: 
SWDIO: pad.0@12.678,-31.455 R52.2 U9.23 | length 4.9
  Top Layer w0.2: v1(13.759,-30.981) 13.568,-31.171 R52.2 13.716,-31.73 15.371,-31.73 15.805,-32.163 U9.23
  Bottom Layer w0.2: pad.0@12.678,-31.455 13.284,-31.455 v1(13.759,-30.981)
SWDIO1: pad.3@27.4,-8.569 R52.1 | length 40.8
  Top Layer w0.2: v1(11.548,-31.07) 12.06,-31.582 R52.1 ; v1(21.974,-9.717) 22.539,-9.152 23.291,-9.152 24.126,-9.988 26.91,-9.988 27.4,-9.498 pad.3@27.4,-8.569
  Signal Layer 2 w0.2: v1(11.548,-31.07) 11,-31.07 10.652,-31.418 10.652,-31.969 10.95,-32.267 15.04,-32.267 19.589,-27.718 19.589,-10.578 20.593,-9.574 21.832,-9.574 v1(21.974,-9.717)
SWDIO2: 
SWRST: C33.2 pad.0@12.678,-36.441 R38.1 U9.4 | length 8.2
  Top Layer w0.2: C33.2 R38.1@15.566,-39.1 ; R38.1 15.983,-39.117 16.325,-38.775 16.325,-37.485 16.605,-37.206 U9.4
  Bottom Layer w0.2: pad.0@12.678,-36.441 15.388,-36.441 v1(16.379,-37.432)
TXD: 
U2-2: 
V3V3: C23.1 C25.2 C26.2 C27.2 C29.2 C32.2 C36.1 L3.2 LB2.2 pad.0@12.678,-30.209 Q6.2 Q7.2 R28.2 R33.1 R34.1 R35.2 R36.2 R38.2 R54.2 U9.1 | length 13.9
  Top Layer w0.2: 9.279,-33.972 9.393,-34.087 R34.1 ; C27.2 14.689,-38.017 R38.2 15.405,-37.839 U9.1 ; v1(17.78,-39.07) R36.2 R54.2 C25.2
  Signal Layer 2 w0.2: v1(15.37,-37.367) 17.073,-39.07 v1(17.78,-39.07)
  Bottom Layer w0.2: v1(10.818,-30.209) pad.0@12.678,-30.209
  other v1: 18.826,-39.085 10.096,-37.455 14.884,-37.365 10.121,-36.908
VBUS: 
VC: C28.2 U8.3 | length 1.4
  Top Layer w0.2: U8.3 20.042,-19.958 C28.2
VDD: C1.2 CN1.7 Q6.3 R4.1 R37.1 | length 26.9
  Top Layer w0.2: CN1.7 17.995,-27.396 v1(18.146,-27.547)
  Signal Layer 2 w0.5: v1(5.994,-33.697) v1(5.994,-33.142) 5.994,-32.116 16.911,-21.199 v1(16.911,-21.158) v1(17.467,-21.158) 17.467,-26.869 v1(18.146,-27.547)
VDD1: C17.1 U5.4 | length 1.4
  Top Layer w0.2: U5.4 19.946,-7.983 C17.1
VDS: C17.2 C19.1 C34.1 Q5.1 Q5.2 Q5.3 R44.1 U5.2 V+.1 | length 20.6
  Top Layer w0.5: C19.1 9.751,-9.878 ; 8.713,-12.303 9.751,-11.265 9.751,-9.878 ; C34.1 17.633,-11.976 17.633,-11.488 U5.2 17.633,-9.88 ; R44.1 19.81,-9.382 19.809,-9.383 18.13,-9.383 17.633,-9.88 ; 9.751,-9.878 12.849,-9.878 12.849,-9.072 13.148,-8.774 15.736,-8.774 16.203,-9.241 16.994,-9.241 17.633,-9.88
  other v2: 6.604,-14.19 5.734,-14.004 8.277,-11.944 7.822,-11.426
VFB: 
VFB1: 
VIN: C37.1 EC6.1 pad.3@24.5,-5.819 Q5.5 Q5.6 Q5.7 Q5.8 R24.1 R43.2 U5.6 | length 39.6
  Top Layer w0.254: 8.275,-7.144 Q5.8@10.749,-7.144 ; R24.1 8.445,-4.931 EC6.1@8.93,-4.446 ; Q5.6@12.849,-3.978 9.398,-3.978 EC6.1@8.93,-4.446 ; Q5.8@13.414,-7.128 13.414,-5.128 9.613,-5.128 EC6.1@8.93,-4.446 ; Q5.8@14.391,-7.647 16.346,-7.647 U5.6@16.683,-7.983
  Top Layer w0.5: R43.2 18.69,-13.831 v1(18.887,-13.634)
  Bottom Layer w0.254: EC6.1@8.93,-4.446 8.93,-5.175 15.525,-11.77 15.525,-14.004 ; 14.817,-13.836 15.067,-14.087
  Bottom Layer w0.5: v1(18.887,-13.634) 18.887,-7.067 v2(19.877,-6.077)
  other v1: 11.523,-7.855 12.123,-7.855 12.723,-7.855 13.323,-7.855 13.923,-7.855 14.523,-7.855 10.923,-7.255 11.523,-7.255 12.123,-7.255 12.723,-7.255 13.323,-7.255 13.923,-7.255 14.523,-7.255 10.323,-6.655 10.923,-6.655 11.523,-6.655 12.123,-6.655 12.723,-6.655 13.323,-6.655 13.923,-6.655 14.523,-6.655 9.723,-6.055 10.323,-6.055 10.923,-6.055 11.523,-6.055 12.123,-6.055 12.723,-6.055 13.323,-6.055 13.923,-6.055 14.523,-6.055 9.123,-5.455 9.723,-5.455 10.323,-5.455 10.923,-5.455 11.523,-5.455 12.123,-5.455 12.723,-5.455 13.323,-5.455 13.923,-5.455 14.523,-5.455 10.323,-4.855 10.923,-4.855 11.523,-4.855 12.123,-4.855 12.723,-4.855 13.323,-4.855 13.923,-4.855 14.523,-4.855 10.323,-4.255 10.923,-4.255 11.523,-4.255 12.123,-4.255 12.723,-4.255 13.323,-4.255 13.923,-4.255 14.523,-4.255
  other v2: 23.352,-6.162 23.952,-6.162 24.552,-6.162 20.477,-6.077 23.352,-5.562 23.952,-5.562 24.552,-5.562 19.877,-5.477 20.477,-5.477
VMS: 
VOUT1: F2.2 pad.3@24.5,-7.769
  other v1: 9.321,-17.901 9.933,-17.891 22.059,-8.071 22.059,-7.521
  other v2: 23.352,-7.769 23.952,-7.769 24.552,-7.769
VXO: C34.2 R43.1 U5.1 | length 3.1
  Top Layer w0.5: R43.1 C34.2 16.683,-12.185 U5.1
XGND: 

## Polygon pours and split planes (outlines as drawn)
SGND on Bottom Layer "Bottom Layer-No Net" (solid, remove dead copper, pour order 67): 19.802,-6.974 18.749,-6.974 18.353,-7.37 18.353,-10.597 17.762,-11.188 11.437,-17.513 11.402,-17.513 5.915,-17.513 5.535,-17.893 5.535,-38.949 6.44,-39.853 6.992,-40.406 8.207,-40.406 21.45,-40.406 21.45,-11.29 21.477,-11.263 21.477,-7.368 21.206,-7.097 21.083,-6.974 20.636,-6.974
VIN on Bottom Layer "Bottom Layer-No Net" (solid, remove dead copper, pour order 62): 16.82,-15.131 17.987,-15.131 18.672,-14.445 18.368,-14.141 18.368,-13.926 18.368,-7.701 17.887,-7.221 17.624,-6.957 16.42,-6.957 15.696,-6.957 15.024,-6.286 cw(c15.609,-5.701) 14.782,-5.701 14.782,-5.43 14.782,-4.323 ccw(c14.429,-4.323) 14.429,-3.97 8.591,-3.97 ccw(c8.591,-4.378) 8.184,-4.378 8.184,-4.95 ccw(c8.688,-4.95) 8.331,-5.307 14.32,-11.296 cw(c14.175,-11.44) 14.38,-11.44 14.38,-14.473 ccw(c15.045,-14.473) 15.045,-15.138
SGND on Bottom Layer "Bottom Layer-No Net" (solid, remove dead copper, pour order 57): 7.298,-15.287 9.012,-13.573 9.012,-12.632 9.012,-10.28 9.183,-10.109 11.825,-10.109 12.147,-10.431 13.355,-11.639 13.355,-12.452 13.355,-13.675 13.025,-14.004 10.144,-16.885 8.047,-16.885 7.298,-16.136
VIN on Bottom Layer "Bottom Layer-No Net" (solid, remove dead copper, pour order 103): 15.072,-15.141 16.809,-15.141 17.48,-14.47 17.48,-8.002 16.42,-6.942 cw(c16.42,-5.32) 15.273,-6.467 15.2,-6.394 13.193,-4.386 ccw(c11.396,-6.182) 11.396,-3.642 9.82,-3.642 8.551,-3.642 ccw(c8.551,-4.006) 8.187,-4.006 8.187,-4.959 ccw(c8.679,-4.959) 8.331,-5.307 14.263,-11.239 cw(c13.535,-11.967) 14.565,-11.967 14.565,-14.641 ccw(c15.054,-14.641) 15.054,-15.131
SGND on Top Layer "Bottom Layer-No Net" (solid, remove dead copper, pour order 63): 21.593,-40.254 21.711,-40.137 21.711,-26.735 21.711,-21.301 22.912,-20.1 22.994,-20.018 22.994,-19.867 22.994,-19.539 22.92,-19.464 21.842,-19.464 21.193,-18.815 21.193,-17.909 20.494,-17.211 19.678,-16.395 13.218,-16.395 12.972,-16.395 11.68,-17.687 5.742,-17.687 5.535,-17.893 5.525,-17.904 5.525,-19.615 5.525,-38.775 6.761,-40.012 7.155,-40.406 8.207,-40.406 21.441,-40.406 21.584,-40.263
VDS on Top Layer "Bottom Layer-No Net" (solid, remove dead copper, pour order 58): 5.7,-14.457 7.187,-14.457 10.449,-11.196 11.509,-11.196 12.948,-11.196 13.194,-10.949 13.194,-8.803 13.037,-8.646 9.144,-8.646 8.974,-8.476 8.932,-8.435 8.932,-8.224 8.932,-8.03 8.78,-7.877 7.883,-7.877 7.481,-7.877 7.395,-7.962 7.263,-8.094 7.263,-8.613 7.263,-10.496 6.643,-11.117 6.633,-11.127 5.968,-11.127 5.379,-11.715 5.379,-14.137 5.7,-14.457
SGND on Signal Layer 1 "Bottom Layer-No Net" (solid, remove dead copper, pour order 66): 19.802,-6.974 18.749,-6.974 18.353,-7.37 18.353,-10.597 17.762,-11.188 11.437,-17.513 11.402,-17.513 5.915,-17.513 5.535,-17.893 5.535,-38.949 6.44,-39.853 6.992,-40.406 8.207,-40.406 21.45,-40.406 21.45,-11.29 21.477,-11.263 21.477,-7.368 21.206,-7.097 21.083,-6.974 20.636,-6.974
VIN on Signal Layer 1 "Bottom Layer-No Net" (solid, remove dead copper, pour order 61): 9.99,-3.958 10.001,-3.969 14.611,-3.969 14.785,-4.143 14.785,-5.9 ccw(c15.003,-5.9) 14.849,-6.054 15.267,-6.472 ccw(c16.42,-5.32) 16.42,-6.95 16.695,-7.225 cw(c15.726,-8.194) 17.097,-8.194 17.097,-10.599 cw(c16.482,-10.599) 16.482,-11.214 8.661,-11.214 8.201,-10.754 6.427,-10.754 5.276,-9.602 5.276,-5.785 5.378,-5.683 7.629,-5.683 7.997,-5.315 7.997,-3.868 8.414,-3.45 9.533,-3.45 9.725,-3.642
SGND on Signal Layer 2 "Bottom Layer-No Net" (solid, remove dead copper, pour order 65): 19.802,-6.974 18.749,-6.974 18.353,-7.37 18.353,-10.597 17.762,-11.188 11.437,-17.513 11.402,-17.513 5.915,-17.513 5.535,-17.893 5.535,-38.949 6.44,-39.853 6.992,-40.406 8.207,-40.406 21.45,-40.406 21.45,-11.29 21.477,-11.263 21.477,-7.368 21.206,-7.097 21.083,-6.974 20.636,-6.974
VIN on Signal Layer 2 "Bottom Layer-No Net" (solid, remove dead copper, pour order 60): 9.99,-3.958 10.08,-4.048 12.191,-4.048 14.536,-4.048 14.785,-4.297 14.785,-5.9 ccw(c15.003,-5.9) 14.849,-6.054 15.019,-6.224 15.267,-6.472 ccw(c16.42,-5.32) 16.42,-6.95 16.695,-7.225 cw(c15.726,-8.194) 17.097,-8.194 17.097,-10.599 cw(c16.482,-10.599) 16.482,-11.214 8.661,-11.214 8.324,-10.876 8.201,-10.754 6.778,-10.754 6.427,-10.754 5.276,-9.602 5.276,-5.785 5.378,-5.683 7.629,-5.683 7.882,-5.43 7.997,-5.315 7.997,-4.779 7.997,-3.868 8.414,-3.45 9.533,-3.45 9.725,-3.642
SGND on Signal Layer 2 "Bottom Layer-No Net" (solid, remove dead copper, pour order 59): 5.601,-5.303 7.432,-5.303 7.619,-5.116 7.619,-2.501 7.402,-2.285 7.329,-2.212 6.98,-2.212 6.553,-2.212 6.192,-2.572 5.538,-3.227 5.538,-5.139 5.538,-5.19 5.641,-5.294

## Keep-outs
Keep-Out Layer:
  circle w0.1: c10.909,-12.393 r0.67
  circle w0.1: c21.897,-33.799 r0.67
  circle w0.1: c10.897,-33.793 r0.67
  circle w0.1: c21.909,-12.399 r0.67
  lines w0.1: 5.228,-4.393 5.225,-9.653 6.724,-9.654 6.723,-10.754 5.225,-10.753 5.21,-37.409 ccw(c8.207,-37.409) 8.207,-40.406 25.296,-40.406 ; 5.232,-4.393 cw(c8.229,-4.393) 8.229,-1.396 25.304,-1.396 cw(c25.304,-4.393) 28.3,-4.393 ; 25.296,-40.404 ccw(c25.296,-37.407) 28.293,-37.407 28.302,-4.393 ; 25.45,-37.6 25.45,-32.4 26.55,-32.4 26.55,-37.6 25.45,-37.6 ; 25.45,-9.369 25.45,-2.669 26.55,-2.669 26.55,-9.369 25.45,-9.369

## Other copper
Top Layer:
  rectangle net SWRST: 14.733,-39.341 15.556,-38.865
  rectangle net VDD1: 18.702,-8.372 19.961,-7.694
  region net SWDIO1: 26.661,-8.065 28.158,-8.065 28.171,-8.078 28.171,-9.493 27.489,-10.175 26.051,-10.175 25.836,-9.96 25.902,-9.894 26.522,-9.894 26.661,-9.755
  region net 3.3V: 18.062,-16.407 19.216,-16.407 20.019,-17.211 20.494,-17.211 20.597,-17.314 20.597,-18.032 20.506,-18.123 19.049,-18.123 18.609,-18.564 18.609,-19.071 18.459,-19.221 17.992,-19.221 17.909,-19.138 17.909,-16.56
  region net V3V3: 21.447,-38.72 21.537,-38.81 21.537,-39.385 21.487,-39.435 17.769,-39.435 17.55,-39.216 17.55,-38.954 17.783,-38.72
  region net V3V3: 14.372,-38.39 15.758,-38.39 15.894,-38.254 15.894,-37.552 15.505,-37.162 15.505,-36.312 15.405,-36.312 14.251,-37.466 14.251,-38.269
  region net V3V3: 9.884,-31.486 9.884,-34.507 10.371,-34.994 10.371,-37.604 10.198,-37.777 9.144,-37.777 9.017,-37.649 9.017,-34.682 8.641,-34.306 8.641,-31.681 8.836,-31.486
  region net VOUT1: 25.383,-7.16 22.038,-7.16 21.797,-7.401 21.797,-8.215 21.953,-8.371 25.383,-8.371
  region net VIN: 25.4,-5.058 19.774,-5.058 19.476,-5.356 19.476,-6.353 19.688,-6.564 25.4,-6.564
  region net SGND: 25.384,-4.465 21.312,-4.465 21.046,-4.2 21.046,-2.647 22.066,-1.627 25.165,-1.627 25.39,-1.853 25.39,-4.459
  region net NetC101_2: 8.482,-25.399 9.4,-25.399 9.83,-24.969 9.83,-23.053 9.792,-23.015 8.645,-23.015 8.3,-23.359 8.3,-25.217
  region net NetC101_1: 5.689,-29.402 7.52,-29.402 7.724,-29.198 7.724,-23.195 7.539,-23.009 5.675,-23.009 5.473,-23.212 5.473,-29.186
  region net NetC10_2: 5.666,-5.882 6.684,-5.882 6.829,-6.026 6.829,-9.114 6.666,-9.277 5.718,-9.277 5.395,-8.954 5.395,-6.153
  region net NetC112_1: 8.799,-21.622 10.086,-21.622 10.281,-21.817 10.281,-22.243 10.419,-22.381 10.978,-22.381 11.086,-22.273 11.086,-19.857 10.978,-19.749 10.438,-19.749 10.342,-19.845 10.342,-20.907 10.134,-21.114 8.799,-21.114
  region net SGND: 8.047,-16.885 11.552,-16.885 13.478,-14.959 13.478,-13.592 13.086,-13.201 9.385,-13.201 7.298,-15.287 7.298,-16.136
  region net VIN: 16.945,-8.54 16.432,-8.54 16.017,-8.125 9.473,-8.125 cw(c9.473,-8.015) 9.363,-8.015 9.363,-7.921 ccw(c8.872,-7.921) 8.872,-7.429 8.208,-7.429 cw(c8.208,-7.193) 7.971,-7.193 7.971,-2.058 cw(c8.375,-2.058) 8.375,-1.654 19.878,-1.654 cw(c19.878,-2.381) 20.606,-2.381 20.606,-4.373 21.672,-5.439 21.914,-5.439 21.914,-6.43 21.78,-6.564 18.863,-6.564 18.46,-6.161 18.131,-5.194 18.131,-4.596 17.301,-3.766 15.297,-3.766 14.688,-3.157 9.798,-3.157 9.574,-3.381 9.574,-3.81 9.677,-3.913 9.801,-3.789 9.801,-3.487 9.913,-3.374 14.573,-3.374 14.816,-3.618 14.816,-5.931 15.019,-6.133 15.019,-7.357 15.354,-7.022 16.492,-7.022 17.041,-7.57 17.041,-8.444
  region net NetKEY1_1: 16.195,-4.148 17.058,-4.148 17.528,-4.618 18.115,-6.523 16.443,-6.387 16.321,-6.387 cw(c16.321,-5.437) 15.372,-5.437 15.372,-4.963 cw(c16.187,-4.963) 16.187,-4.147
  region net LEDA: 14.618,-22.443 14.954,-22.443 cw(c14.954,-22.614) 15.125,-22.614 15.125,-25.922 cw(c14.993,-25.922) 14.993,-26.054 14.817,-26.054 cw(c14.817,-25.879) 14.642,-25.879 14.642,-24.231 ccw(c14.103,-24.231) 14.484,-23.849 14.45,-23.815 cw(c14.99,-23.275) 14.227,-23.275 14.227,-22.632 cw(c14.414,-22.632) 14.414,-22.444
  region net NetQ1_3: 12.871,-23.444 13.397,-23.444 ccw(c13.397,-23.283) 13.558,-23.283 13.558,-22.514 cw(c14.338,-22.514) 14.338,-21.733 14.41,-21.733 ccw(c14.41,-21.446) 14.697,-21.446 14.697,-20.976 ccw(c14.293,-20.976) 14.293,-20.573 13.234,-20.573 ccw(c13.234,-21.115) 12.693,-21.115 12.693,-23.282 ccw(c12.852,-23.282) 12.852,-23.441
  region net PA9: 14.494,-17.681 15.479,-17.681 cw(c15.479,-17.891) 15.689,-17.891 15.689,-19.519 cw(c15.451,-19.519) 15.451,-19.757 14.582,-19.757 cw(c14.582,-19.424) 14.25,-19.424 14.25,-17.865 cw(c14.434,-17.865) 14.434,-17.681
  region net V3V3: 8.148,-26.425 8.148,-26.308 cw(c8.582,-26.308) 8.582,-25.873 9.51,-25.873 cw(c9.51,-26.624) 10.261,-26.624 10.261,-28.562 cw(c8.799,-28.562) 9.833,-29.596 9.316,-30.113 ccw(c9.529,-30.326) 9.227,-30.326 9.232,-30.326 9.298,-30.392 ccw(c9.339,-30.35) 9.339,-30.409 ccw(c9.339,-30.261) 9.444,-30.365 10.083,-29.727 ccw(c9.011,-28.655) 10.526,-28.655 10.526,-25.423 cw(c13.041,-25.423) 11.263,-23.644 11.349,-23.558 ccw(c10.931,-23.141) 11.522,-23.141 11.522,-18.154 cw(c12.29,-18.154) 11.747,-17.611 12.761,-16.597 cw(c13.218,-17.053) 13.218,-16.408 16.897,-16.408 cw(c16.897,-16.988) 17.478,-16.988 17.478,-19.081 cw(c17.339,-19.081) 17.339,-19.219 16.509,-19.219 cw(c16.509,-18.771) 16.061,-18.771 16.061,-17.913 ccw(c15.468,-17.913) 15.468,-17.321 14.289,-17.321 ccw(c14.289,-17.769) 13.841,-17.769 13.841,-19.767 cw(c13.586,-19.767) 13.586,-20.022 13.162,-20.022 ccw(c13.162,-20.976) 12.207,-20.976 12.207,-23.465 cw(c10.917,-23.465) 11.83,-24.377 ccw(c12.98,-25.528) 11.353,-25.528 11.353,-28.821 cw(c8.813,-28.821) 10.609,-30.617 10.299,-30.927 ccw(c11.975,-32.604) 9.604,-32.604 9.604,-34.2 cw(c9.42,-34.2) 9.42,-34.384 7.937,-34.384 cw(c7.937,-34.016) 7.568,-34.016 7.568,-33.221 cw(c7.88,-33.221) 7.659,-33 7.933,-32.727 ccw(c7.383,-32.178) 8.16,-32.178 8.16,-26.454 ccw(c8.118,-26.454)
  region net VDD: 16.752,-22.097 17.92,-22.097 ccw(c17.92,-21.97) 18.048,-21.97 18.048,-21.161 ccw(c17.8,-21.161) 17.8,-20.914 16.749,-20.914 ccw(c16.749,-21.12) 16.542,-21.12 16.542,-21.963 ccw(c16.677,-21.963) 16.677,-22.097
  region net SCL1: 17.369,-25.942 17.369,-22.673 cw(c17.509,-22.673) 17.509,-22.533 18.833,-22.533 cw(c18.833,-22.671) 18.972,-22.671 18.972,-23.172 cw(c18.798,-23.172) 18.798,-23.345 17.922,-23.345 ccw(c17.922,-23.648) 17.619,-23.648 17.619,-25.92 cw(c17.486,-25.92) 17.486,-26.053 17.477,-26.053 cw(c17.477,-25.946) 17.37,-25.946
  region net SDA1: 15.739,-22.54 16.981,-22.54 cw(c16.981,-22.679) 17.119,-22.679 17.119,-25.933 cw(c17.007,-25.933) 17.007,-26.045 16.978,-26.045 cw(c16.978,-25.935) 16.868,-25.935 16.868,-23.555 ccw(c16.614,-23.555) 16.614,-23.301 15.839,-23.301 cw(c15.839,-23.062) 15.601,-23.062 15.601,-22.665 cw(c15.724,-22.665) 15.724,-22.541
  region net SGND: 5.784,-29.826 7.442,-29.826 cw(c7.442,-30.068) 7.684,-30.068 7.684,-32.227 cw(c7.417,-32.227) 7.417,-32.494 7.033,-32.494 cw(c7.033,-32.259) 6.797,-32.259 6.797,-32.238 ccw(c6.239,-32.238) 6.239,-31.68 5.781,-31.68 cw(c5.781,-31.49) 5.591,-31.49 5.591,-30.001 cw(c5.762,-30.001) 5.762,-29.83
  region net VDD: 5.915,-32.054 6.185,-32.054 cw(c6.185,-32.249) 6.38,-32.249 6.38,-32.351 ccw(c6.739,-32.351) 6.485,-32.605 6.735,-32.855 cw(c6.385,-33.205) 6.88,-33.205 6.88,-35 cw(c6.605,-35) 6.605,-35.275 5.76,-35.275 cw(c5.76,-35.1) 5.585,-35.1 5.585,-32.229 cw(c5.758,-32.229) 5.758,-32.055
  region net NetC24_1: 6.621,-17.731 5.786,-17.731 ccw(c5.786,-17.997) 5.52,-17.997 5.52,-22.283 ccw(c5.858,-22.283) 5.858,-22.621 7.255,-22.621 ccw(c7.255,-22.529) 7.347,-22.529 7.347,-17.982 ccw(c7.098,-17.982) 7.098,-17.733
  region net VOUT1: 8.152,-17.513 ccw(c8.152,-17.734) 7.93,-17.734 7.93,-18.521 ccw(c8.182,-18.521) 8.182,-18.773 9.952,-18.773 ccw(c9.952,-18.528) 10.197,-18.528 10.197,-17.814 ccw(c9.896,-17.814) 9.896,-17.513
  region net SGND: 7.428,-5.303 ccw(c7.428,-5.116) 7.615,-5.116 7.615,-2.683 ccw(c7.136,-2.683) 7.136,-2.204 ccw(c7.136,-3.799) 5.541,-3.799 5.541,-5.139 ccw(c5.706,-5.139) 5.706,-5.303
Signal Layer 1:
  region net SGND: 23.181,-4.459 22.504,-5.136 22.504,-6.433 21.477,-7.46 21.477,-11.263 20.893,-11.847 20.893,-14.558 19.444,-14.558 19.444,-7.333 19.802,-6.974 20.636,-6.974 21.644,-5.966 21.644,-2.05 22.066,-1.627 25.165,-1.627 25.39,-1.853 25.39,-4.459
  region net VIN: 25.4,-5.058 23.397,-5.058 23.028,-5.428 23.028,-6.278 23.314,-6.564 25.4,-6.564
  region net VIN: 19.796,-1.654 20.868,-2.726 20.868,-6.295 20.63,-6.532 19.656,-6.532 18.131,-5.007 18.131,-4.596 16.126,-2.59 16.126,-1.928 16.4,-1.654
  region net VIN: 9.566,-5.175 8.393,-5.175 7.997,-4.779 7.997,-2.032 8.375,-1.654 18.405,-1.654 18.405,-3.766 10.182,-3.766 9.798,-4.15 9.798,-4.943
  region net SGND: 8.047,-16.885 11.552,-16.885 13.478,-14.959 13.478,-13.592 13.086,-13.201 9.385,-13.201 7.298,-15.287 7.298,-16.136
  region net SGND: 5.601,-5.303 6.998,-5.303 7.385,-4.916 7.385,-2.453 7.136,-2.204 6.49,-2.204 5.478,-3.217 5.478,-5.18
  region net VDS: 7.187,-14.457 9.012,-12.632 9.012,-12.127 8.012,-11.127 5.968,-11.127 5.379,-11.715 5.379,-14.137 5.7,-14.457
Signal Layer 2:
  rectangle net SGND: 22.824,-4.456 24.983,-2.474
  region net V3V3: 9.934,-36.653 10.313,-36.653 10.755,-37.094 15.557,-37.094 15.716,-37.254 15.716,-37.493 17.026,-38.803 18.965,-38.803 19.133,-38.971 19.133,-39.192 18.983,-39.342 16.858,-39.342 15.214,-37.698 9.961,-37.698 9.83,-37.567 9.83,-36.756
  region net SGND: 8.047,-16.885 11.552,-16.885 13.478,-14.959 13.478,-13.592 13.086,-13.201 9.385,-13.201 7.298,-15.287 7.298,-16.136
  region net VIN: 9.566,-5.175 8.393,-5.175 7.997,-4.779 7.997,-2.032 8.375,-1.654 21.116,-1.654 21.905,-2.443 21.905,-4.354 22.61,-5.058 25.4,-5.058 25.4,-6.564 25.393,-6.572 19.508,-6.572 18.131,-5.194 18.131,-4.596 17.301,-3.766 10.182,-3.766 9.798,-4.15 9.798,-4.943
  region net VDS: 7.187,-14.457 9.012,-12.632 9.012,-12.127 8.012,-11.127 5.968,-11.127 5.379,-11.715 5.379,-14.137 5.7,-14.457
Bottom Layer:
  rectangle net SWCLK1: 26.852,-7.243 28.043,-6.691
  rectangle net SDA: 26.852,-5.643 28.043,-5.091
  rectangle net SCL: 26.852,-4.043 28.043,-3.491
  region net VOUT1: 25.383,-7.16 25.383,-8.371 25.383,-8.372 19.961,-8.372 19.961,-7.358 20.159,-7.16
  region net SGND: 12.281,-33.493 13.397,-33.493 13.545,-33.641 14.14,-33.641 14.305,-33.806 14.305,-34.493 14.03,-34.767 13.587,-34.767 13.224,-34.404 12.341,-34.404 12.146,-34.21 12.146,-33.628
  region net VOUT1: 19.813,-7.16 19.444,-7.529 19.444,-14.042 17.988,-15.497 13.418,-15.497 11.402,-17.513 8.822,-17.513 8.558,-17.777 8.558,-18.165 8.792,-18.399 11.691,-18.399 13.778,-16.312 18.507,-16.312 20.111,-14.709 20.111,-8.581 20.321,-8.371 22.152,-8.371 22.379,-8.144 22.379,-7.306 22.233,-7.16
  region net VIN: 25.4,-5.058 19.774,-5.058 19.476,-5.356 19.476,-6.353 19.688,-6.564 25.4,-6.564
  region net VIN: 14.429,-3.97 14.77,-4.311 14.77,-5.975 15.267,-6.472 15.267,-7.406 14.826,-7.847 13.159,-7.847 11.871,-6.558 11.871,-4.271 12.172,-3.97
  region net VDS: 5.7,-14.457 7.187,-14.457 8.553,-13.092 8.553,-11.676 7.994,-11.117 5.978,-11.117 5.387,-11.708 5.387,-14.145
  pour cut-out: 13.265,-29.483 13.587,-29.805 13.587,-36.76 13.098,-37.248 12.168,-37.248 11.703,-36.783 11.703,-29.904 12.124,-29.483
  region net SGND: 25.384,-4.465 18.001,-4.465 17.301,-3.766 10.137,-3.766 9.804,-3.433 8.102,-3.433 7.615,-3.92 7.615,-5.116 13.899,-11.4 13.899,-14.538 11.552,-16.885 8.047,-16.885 7.298,-16.136 7.298,-15.287 9.385,-13.201 12.096,-13.201 12.339,-12.957 12.339,-12.121 11.763,-11.544 9.01,-11.544 5.539,-8.074 5.539,-3.883 cw(c7.106,-3.883) 5.998,-2.775 6.395,-2.378 cw(c8.191,-4.174) 8.191,-1.634 25.038,-1.634 cw(c25.038,-1.98) 25.383,-1.98

## Silkscreen, mask and mechanical layers (free items; w line width, h text height)
Top Overlay:
  circle w0.05: c16.412,-5.352 r1.591
  circle w0.1: c16.412,-5.352 r0.9
  lines w0.1: 8.854,-4.912 cw(c8.855,-4.537) 8.855,-4.162 ; 10.297,-34.091 10.296,-35.294 11.496,-35.295 11.497,-34.091 ; 10.297,-33.494 10.298,-32.294 11.498,-32.295 11.497,-33.495 ; 10.308,-12.691 10.308,-13.894 11.508,-13.895 11.508,-12.691 ; 10.309,-12.094 10.309,-10.894 11.509,-10.895 11.509,-12.095 ; 12.545,-25.196 12.545,-30.396 20.945,-30.396 20.945,-25.196 ; 13.745,-30.396 13.745,-29.596 19.745,-29.596 19.745,-30.396 ; 21.297,-34.097 21.296,-35.3 22.496,-35.301 22.497,-34.097 ; 21.297,-33.5 21.298,-32.3 22.498,-32.301 22.497,-33.501 ; 21.308,-12.697 21.308,-13.9 22.508,-13.901 22.508,-12.697 ; 21.309,-12.1 21.309,-10.9 22.509,-10.901 22.509,-12.101 ; 25.162,-6.603 7.662,-6.594 ccw(c7.661,-7.494) 6.761,-7.493 6.744,-38.693 ccw(c7.644,-38.694) 7.644,-39.594 25.144,-39.603 ccw(c25.144,-38.703) 26.044,-38.704 26.045,-37.556 ; 26.048,-32.256 26.06,-9.39 ; 6.604,-4.91 cw(c6.605,-4.535) 6.605,-4.16 6.855,-4.161 cw(c6.855,-4.536) 6.854,-4.911 6.604,-4.91
Bottom Overlay:
  lines w0.1: 6.723,-10.714 28.3,-10.714 28.3,-9.714 6.724,-9.714 ; 21.45,-40.406 21.45,-1.434 ; 25.5,-40.406 25.5,-1.434 ; 26.5,-40.406 26.5,-1.434
  text "VCC" at 10.913,-29.935 h0.6
  text "SWDIO" at 13.412,-31.696 h0.6
  text "SWCLK" at 10.057,-32.725 h0.6
  text "GND" at 13.367,-34.142 h0.6
  text "B00T0" at 10.443,-35.502 h0.6
  text "SWRST" at 13.383,-36.66 h0.6
Top Solder:
  rectangle: 9.02,-2.935 19.94,-1.786
  rectangle: 9.435,-8.091 14.736,-3.538
Bottom Solder:
  rectangle: 10.645,-3.438 20.791,-1.814